# Altium PCB Propulsion_v1.PcbDoc
Units mil, origin at the board's own origin, x right, y up, seen from the top; angles counter-clockwise.
Board outline 2834.65 x 1968.5 mil, 2 copper layers (Top Layer, Bottom Layer), stack 62.441 mil thick; 16 components, 16 nets, 70 pads, 0 vias.
Unrouted connection lines stored in the file: 12.
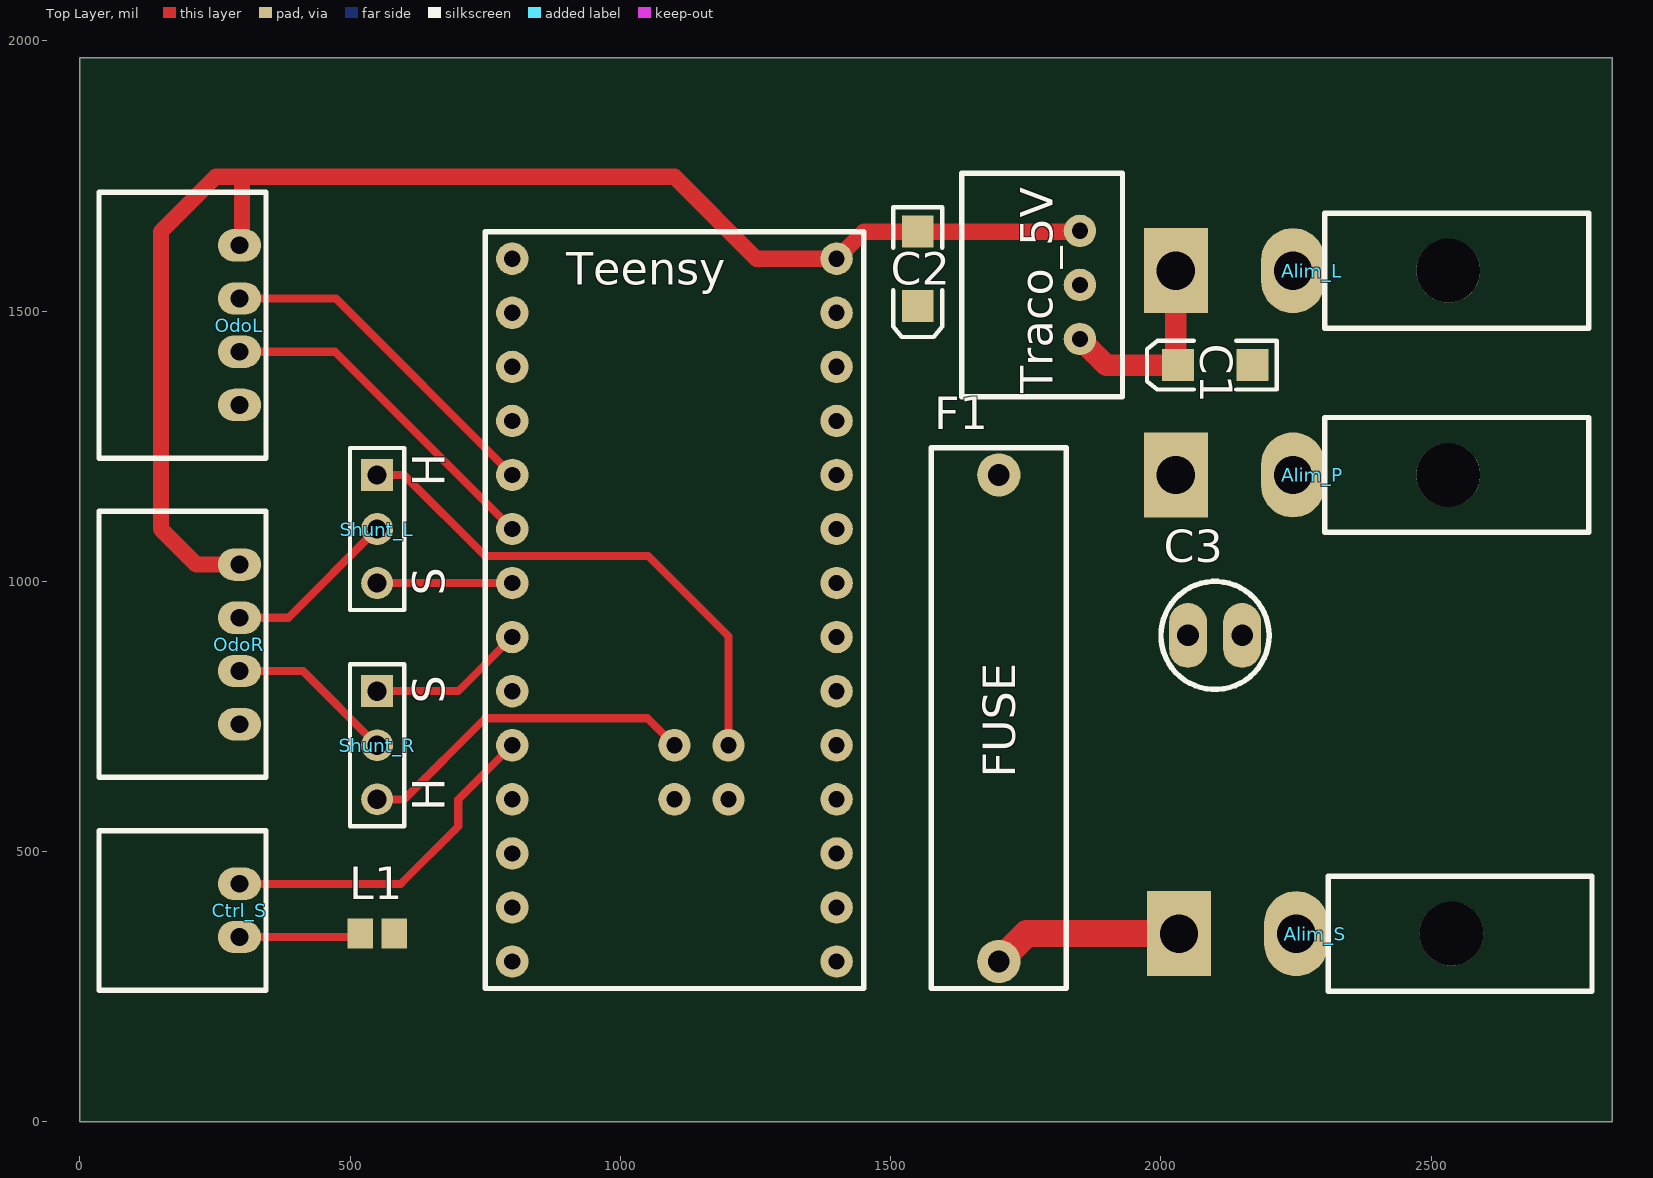
[diagram p0: Top Layer view]
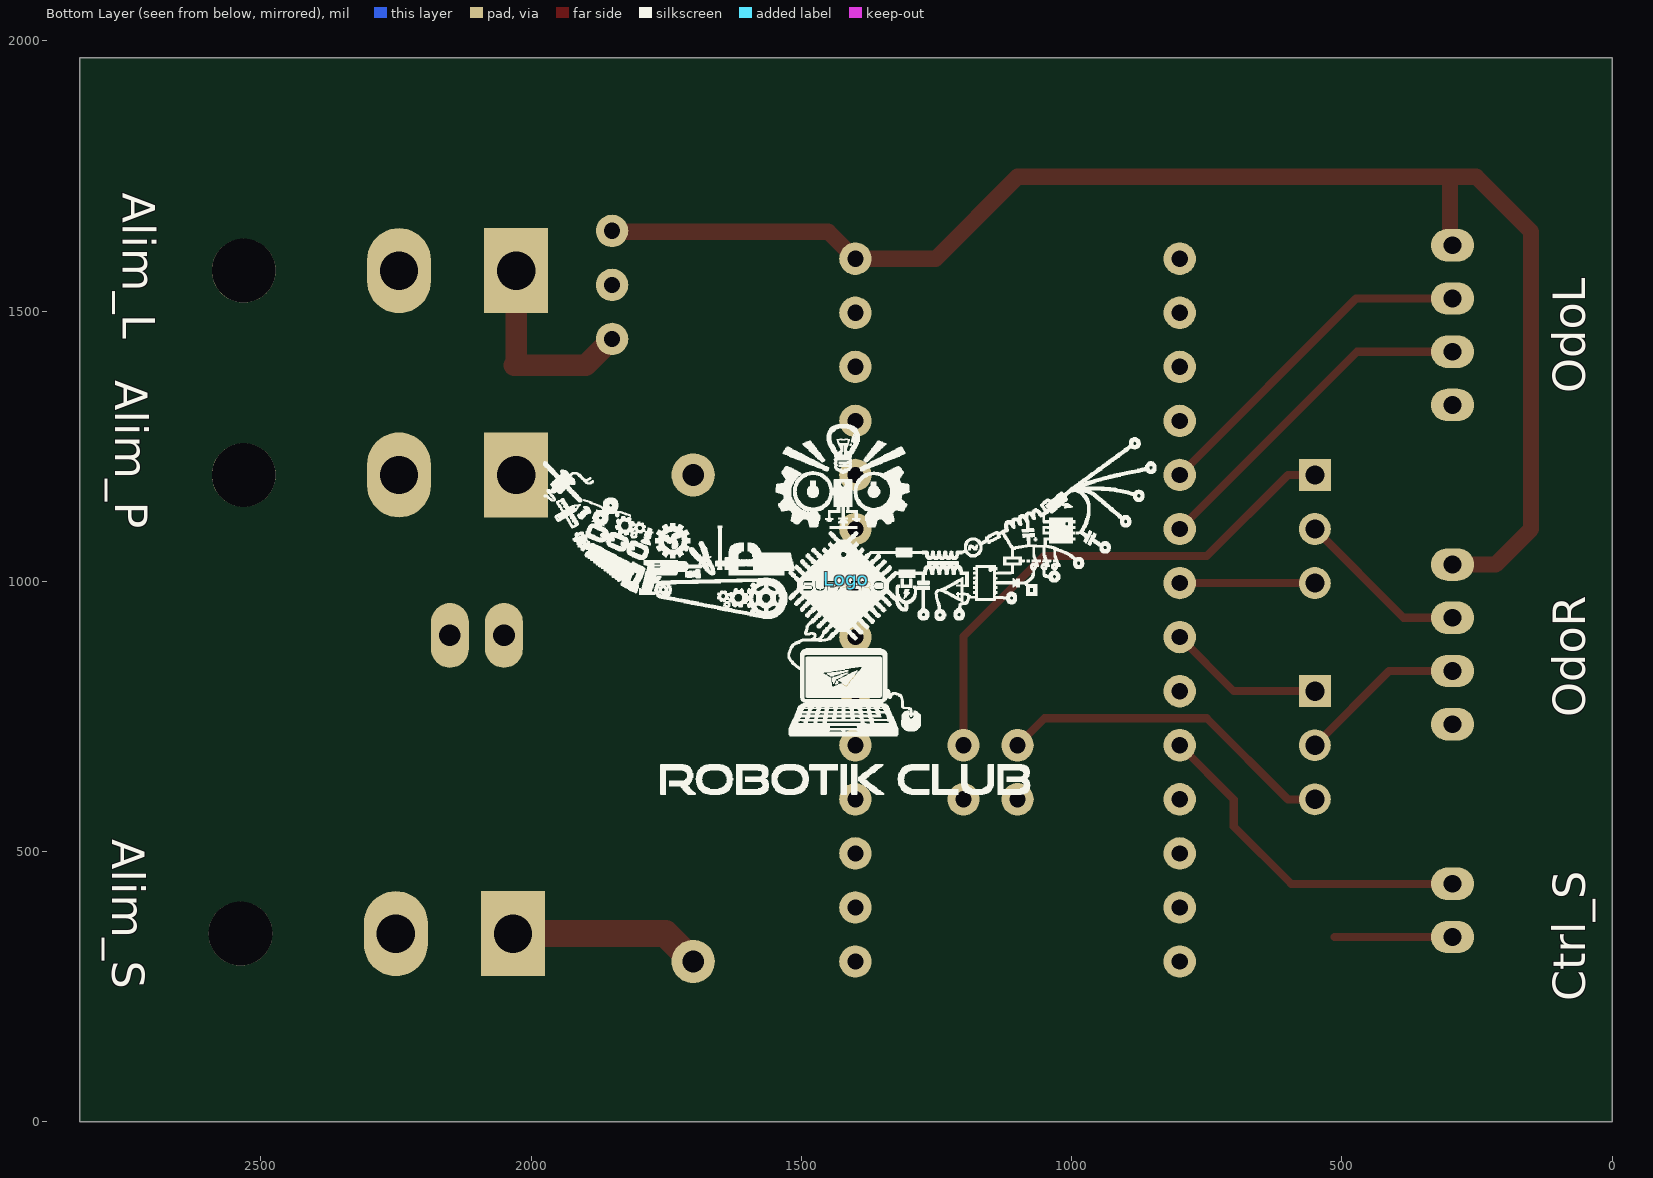
[diagram p1: Bottom Layer view, seen from below]

## Layer stack, top to bottom
Top Solder: solder mask 0.4, Solder Resist, Dk 3.5
Top Layer: signal copper 0.7087
Dielectric1: core 61.0236, FR-4, Dk 4.8
Bottom Layer: signal copper 0.7087
Bottom Solder: solder mask 0.4, Solder Resist, Dk 3.5

## Board outline
0,1968.5 0,0 2834.65,0 2834.65,1968.5

## Design rules (kind name [scope] priority, off if disabled: settings)
BoardOutlineClearance [All] p1: gap=9.84 except(0: Arc-SplitContinuation Track-SplitContinuation SMDPad-SplitContinuation THPad-SplitContinuation Via-SplitContinuation Fill-SplitContinuation Poly-SplitContinuation Region-SplitContinuation Text-SplitContinuation)
Clearance Clearance-xPP-xTP-xTT [All] p1: gap=12
ComponentClearance [All] p1: gap=9.84 collisioncheckmode=3 verticalgap=9.84 showdistances=FALSE
DiffPairsRouting [All] p1: maxlimit=9.84 minlimit=9.84 mostfreqgap=9.84 toplayer_minwidth=15 toplayer_maxwidth=15 toplayer_prefwidth=15 bottomlayer_minwidth=15 bottomlayer_maxwidth=15 bottomlayer_prefwidth=15 maxuncoupledlength=492.13
Height [All] p1: minheight=0 maxheight=984.25 prefheight=492.13
HoleSize HoleSize-PTH [All] p1: absolutevalues=TRUE maxlimit=78.74 minlimit=9.84 maxpercent=80.000 minpercent=20.000
HoleToHoleClearance [All] p1: gap=13.78 allowstackedmicrovias=TRUE
MinimumAnnularRing "Minimum IAR  >0.45mm" [((ObjectKind = 'Pad') OR (ObjectKind = 'Via')) And (Layer = 'MultiLayer') And (HoleDiameter > AsMM(0.45))] p1: minimumring=6.89 // minimum inner annular ring for pads > 0.45mm finished hole size
MinimumAnnularRing "Minimum IAR <=0.45mm" [((ObjectKind = 'Pad') OR (ObjectKind = 'Via')) And (Layer = 'MultiLayer') And (HoleDiameter <= AsMM(0.45))] p2: minimumring=6.89 // minimum inner annular ring for pads <= 0.45mm finished hole size
MinimumSolderMaskSliver [All] p1: minsoldermaskwidth=3.15
PlaneClearance PlaneClearance-IPI [All] p1: clearance=15
PlaneConnect [All] p1: planeconnectstyle=Relief reliefexpansion=10 reliefentries=4 reliefconductorwidth=15 reliefairgap=15
PolygonConnect [All] p1: connectstyle=Relief reliefconductorwidth=10 reliefentries=4 polygonreliefangle="90 Angle" airgapwidth=10
RoutingCorners [All] p1: cornerstyle=45-Degree minsetback=98.43 maxsetback=98.43
RoutingVias "RoutingVias > 0.45mm" [(ObjectKind = 'Via') And (HoleDiameter > AsMM(0.45))] p1: holewidth=19.68 width=33.46 viastyle="Through Hole" minholewidth=19.68 minwidth=33.46 maxholewidth=35.43 maxwidth=49.21 // finishet hole size > 0.45mm
RoutingVias "RoutingVias <= 0.45mm" [(ObjectKind = 'Via') And (HoleDiameter <= AsMM(0.45))] p2: holewidth=11.81 width=25.59 viastyle="Through Hole" minholewidth=9.84 minwidth=23.62 maxholewidth=17.72 maxwidth=31.5 // finishet hole size <= 0.45mm
SilkToSilkClearance [All] p1: silktosilkclearance=7.87
SilkToSolderMaskClearance SilkscreenOverComponentPads [IsPad] p1: minsilkscreentomaskgap=7.87 clearancetoexposedcopper=TRUE
SolderMaskExpansion [All] p1: expansion=0
Width Width-xTW [All] p1: maxlimit=50 minlimit=10 preferedwidth=15 minimp=50.000000 maximp=50.000000 favimp=50.000000
19 further rules are at their usual default settings.

## Classes and differential pairs
component class Propulsion: Alim_L Alim_P Alim_S C1 C2 Ctrl_S F1 L1 OdoL OdoR Shunt_L Shunt_R Teensy Traco_5V

## Components (designator, comment, footprint, x,y, rotation, side; value= is the part's Value field where it differs from the comment)
Alim_L "Minifit Jr 2x1H" MOLEX_MINIFITJR_2X1H 2244.09,1574.8 r0 top
Alim_P "Minifit Jr 2x1H" MOLEX_MINIFITJR_2X1H 2244.09,1196.85 r0 top
Alim_S "Minifit Jr 2x1H" MOLEX_MINIFITJR_2X1H 2250,348.43 r0 top
C1 "Cap22uF" 3.2X1.6X1.1 2100,1400 r180 top
C2 "Cap50uF" 3.2X1.6X1.1 1550,1577.95 r270 top
C3 "Cap50uF" CONDENSATEUR 2100,900 r0 top
Ctrl_S "SPOX 2x1H" "MOLEX SPOX 2X1H" 295.28,440.55 r270 top
F1 "10A" FUSE 1700,746.85 r90 top
L1 "Inductor" 2029 550,348.43 r180 top
Logo "Logo" Logo_Highres 1417.32,1003.94 r180 bottom
OdoL "SPOX 4x1H" "MOLEX SPOX 4X1H" 295.28,1621.65 r270 top
OdoR "SPOX 4x1H" "MOLEX SPOX 4X1H" 295.28,1031.1 r270 top
Shunt_L "Shunt selector" HDR1X3 550,1196.85 r270 top
Shunt_R "Shunt selector" HDR1X3 550,796.85 r270 top
Teensy "Teensy 3.2" TEENSY 700,796.85 r0 top
Traco_5V "Traco TRS2-2450" TRS0.5 1850,1548.43 r270 top

## Footprints (in the part's own frame and the unit in brackets; to place one, negate y for a bottom-side part, rotate by r counter-clockwise, add the part's x,y. Pads: shape width x height; smd on the part's side, far side on the other; paste and mask are expansions set on the pad)
3.2X1.6X1.1 [mm] "SMT LED; 2 Flat Leads"
  rect 1.5x1.5 smd: 1(-1.75,0) 2(1.75,0)
  silkscreen extent -2.9,-1.15 3.2,1.15
2029 [mm] "Chip Inductor, Body 2.0x1.2mm, IPC High Density"
  rect 1.2x1.4 smd: 1(-0.8,0) 2(0.8,0)
  body extent -1.1,-0.7 1.1,0.7, height 0.55
CONDENSATEUR [mil]
  oval 70x120 hole 40: 1(-50,0) 2(50,0)
  silkscreen extent -100,-100 100,100, body extent -100,-100 100,100, height 394
FUSE [mil]
  round 80 hole 40: 1(-450,0) 2(450,0)
  silkscreen extent -500,-125 500,125, body extent -505,-130 505,130, height 315
HDR1X3 [mm] "Connector; Header; 3 Position"
  rect 1.5x1.5 hole 0.9: 1(0,0)
  round 1.5 hole 0.9: 2(2.54,0) 3(5.08,0)
  silkscreen extent -1.27,-1.27 6.35,1.27
Logo_Highres [mil]
  silkscreen extent -560,-399 574,286
"MOLEX SPOX 2X1H" [mil] "Prise CI, Molex, 3 Contacts, 1 rangée, entraxe 2.5mm, 3A, Coudé, ref 22-03-5035"
  oval 60x80 hole 33: 1(0,0) 2(98.43,0)
  silkscreen extent -98,-260 197,49, body extent -98,-262 193,49, height 193
"MOLEX SPOX 4X1H" [mil] "Prise CI, Molex, 3 Contacts, 1 rangée, entraxe 2.5mm, 3A, Coudé, ref 22-03-5035"
  oval 60x80 hole 33: 1(0,0) 2(98.43,0) 3(196.85,0) 4(295.28,0)
  silkscreen extent -98,-260 394,49, body extent -98,-262 390,49, height 193
MOLEX_MINIFITJR_2X1H [mm] "Connecteur Molex 2"
  rect 3x4 hole 1.8: 1(-5.5,0)
  oval 3x4 hole 1.8: 2(0,0)
  round 3 hole 3 unplated: 3(7.3,0)
  silkscreen extent 1.5,-2.7 13.9,2.7, body extent -6.03,-2.7 13.9,3.1, height 11.01
TEENSY [mil] "Teensy 3.2"
  round 60 hole 30: 0(100,700) 1(100,600) 2(100,500) 3(100,400) 4(100,300) 5(100,200) 6(100,100) 7(100,0) 8(100,-100) 9(100,-200) 10(100,-300) 11(100,-400) 12(100,-500) 13(700,-500) 14(700,-400) 15(700,-300) 16(700,-200) 17(700,-100) 18(700,0) 19(700,100) 20(700,200) 21(700,300) 22(700,400) 23(700,500) 25(400,-100) 26(400,-200) 31(500,-200) 32(500,-100) 41(700,600) 42(700,700) 43(700,800) 44(100,800)
  silkscreen extent 50,-550 750,850, body extent 48,-550 752,907, height 505
TRS0.5 [mil]
  round 60 hole 30: 1(100,0) 2(0,0) 3(-100,0)
  silkscreen extent -207,-219 207,79, body extent -207,-218 207,79, height 402

## Part data
Alim_L Alim_P Alim_S: library part "Header 2", "Molex Minifit Jr 2x1H"
C1 C2 C3: library part Cap, "Capacitor"
Ctrl_S: library part "Header 2", "Molex SPOX Jr 2x1H"
F1: library part "Fuse 1", "Fuse"
OdoL OdoR: library part "Header 4H", "Molex SPOX 4x1H"
Shunt_L Shunt_R: library part "Header 3", "Header, 3-Pin"
Teensy: library part teensy3.2
Traco_5V: library part "Volt Reg", "Voltage Regulator"

## Nets (pads, with @x,y where several pads share a name; then routed paths per layer and width w, separated by ;. In a path a pad name is that pad's centre, name@x,y a point inside that pad or via, vN(x,y) a via of type N, cw(c..) or ccw(c..) an arc to the next point about the centre after c; other vN are vias at no path point)
5VL: C2.1 OdoL.1 OdoR.1 Teensy.43 Traco_5V.3 | length 2670.1
  Top Layer w30: OdoR.1 215.75,1031.1 150,1096.85 150,1646.85 251.57,1748.43 300,1748.43 ; OdoL.1@300,1626.38 300,1748.43 ; Traco_5V.3@1850,1646.85 1450,1646.85 Teensy.43 1251.57,1596.85 1100,1748.43 300,1748.43
24VL: Alim_L.1 C1.2 Traco_5V.1 | length 377.4
  Top Layer w40: Traco_5V.1 1898.43,1400 C1.2 2027.56,1403.54 Alim_L.1
24VP: Alim_P.1 C3.1 F1.2
24VS: Alim_S.1 F1.1 | length 354.8
  Top Layer w50: F1.1 1751.57,348.43 Alim_S.1
A_L: OdoL.2 Teensy.3 | length 639.9
  Top Layer w15: OdoL.2 473.62,1523.23 Teensy.3
A_R: OdoR.2 Shunt_L.2 | length 322.7
  Top Layer w15: OdoR.2 385.83,932.68 Shunt_L.2
A_R_HW: Shunt_L.1 Teensy.32 | length 975.2
  Top Layer w15: Shunt_L.1 600,1196.85 750,1046.85 1051.57,1046.85 1200,898.43 Teensy.32
A_R_SW: Shunt_L.3 Teensy.5 | length 250
  Top Layer w15: Shunt_L.3 Teensy.5
B_L: OdoL.3 Teensy.4 | length 640.6
  Top Layer w15: OdoL.3 472.05,1424.8 Teensy.4
B_R: OdoR.3 Shunt_R.2 | length 311.6
  Top Layer w15: OdoR.3 412.6,834.25 Shunt_R.2
B_R_HW: Shunt_R.3 Teensy.25 | length 632.8
  Top Layer w15: Shunt_R.3 600,596.85 750,746.85 1050,746.85 Teensy.25
B_R_SW: Shunt_R.1 Teensy.6 | length 291.4
  Top Layer w15: Shunt_R.1 700,796.85 Teensy.6
GND: Alim_L.2 C1.1 C2.2 L1.1 OdoL.4 OdoR.4 Teensy.42 Teensy.44 Traco_5V.2
GNDP: Alim_P.2 Alim_S.2 C3.2
GNDS: Ctrl_S.2 L1.2 | length 218.5
  Top Layer w15: Ctrl_S.2 L1.2@513.78,342.13
TX_SABER: Ctrl_S.1 Teensy.8 | length 640.2
  Top Layer w15: Ctrl_S.1 593.7,440.55 700,546.85 700,596.85 Teensy.8
pads on no net: Alim_L.3 Alim_P.3 Alim_S.3 Teensy.0 Teensy.1 Teensy.2 Teensy.7 Teensy.9 Teensy.10 Teensy.11 Teensy.12 Teensy.13 Teensy.14 Teensy.15 Teensy.16 Teensy.17 Teensy.18 Teensy.19 Teensy.20 Teensy.21 Teensy.22 Teensy.23 Teensy.26 Teensy.31 Teensy.41

## Silkscreen, mask and mechanical layers (free items; w line width, h text height)
Top Overlay:
  text "H" at 675,1175 h60 r90
  text "S" at 675,973.43 h60 r90
  text "S" at 675,773.43 h60 r90
  text "H" at 675,575 h60 r90
Bottom Overlay:
  text "Supaero / Robotik / Club" at 3464.57,1771.65 h60
Mechanical 1:
  the board outline again, w7.87

## Dimensions
0,0 to 0,1968.5 on Mechanical 15
0,0 to 2834.65,0 on Mechanical 15

## Text inside footprints (layer, text, board x,y; h text height)
F1: Top Overlay "FUSE" at 1730,636.85 h60 r90